# Altium PCB Octo-Electrode.PcbDoc (part 5 of 6)
Units mm, origin at the board's own origin, x right, y up, seen from the top; angles counter-clockwise.
Board outline 202.91 x 135.89 mm, 2 copper layers (Top Layer, Bottom Layer); 289 components, 165 nets, 790 pads, 510 vias.
Unrouted connection lines stored in the file: 83.
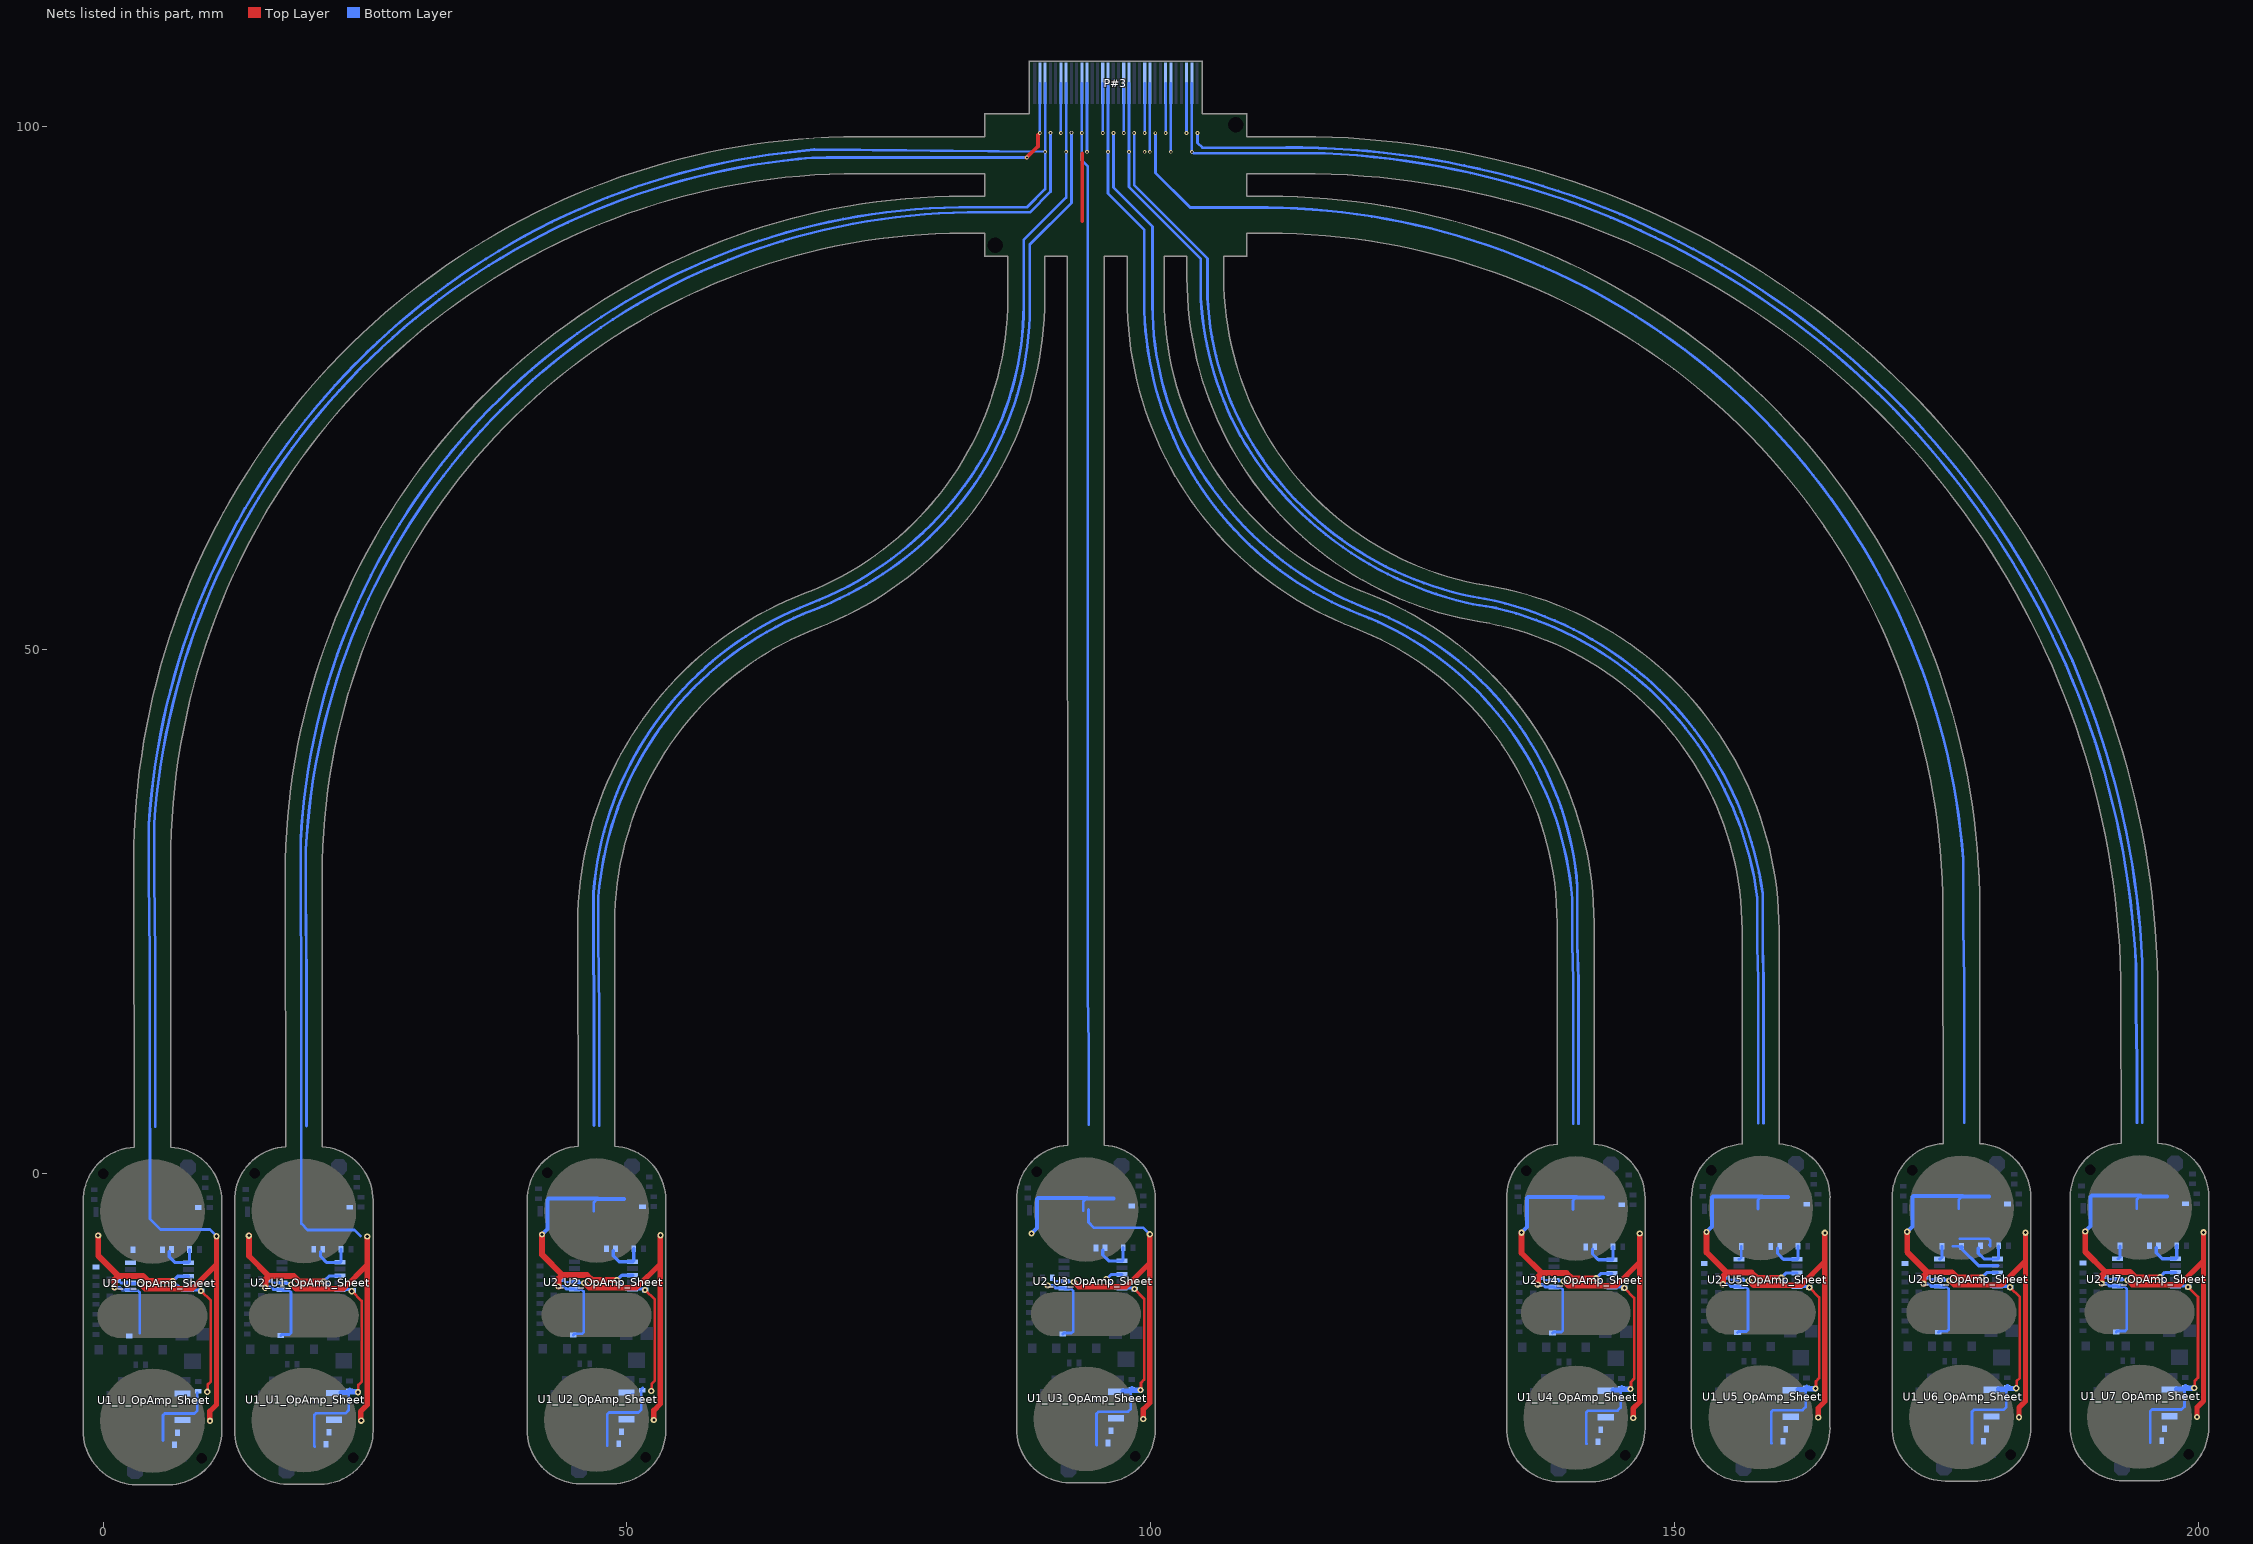
[diagram p4: the nets of this part, all layers, seen from the top]

## Via types
v1: diameter 0.6, hole 0.3, Top Layer to Bottom Layer, tented both sides, 464 vias
v2: diameter 0.35, hole 0.2, Top Layer to Bottom Layer, 46 vias

## Nets (pads, with @x,y where several pads share a name; then routed paths per layer and width w, separated by ;. In a path a pad name is that pad's centre, name@x,y a point inside that pad or via, vN(x,y) a via of type N, cw(c..) or ccw(c..) an arc to the next point about the centre after c; other vN are vias at no path point) (continued)
RECT_U5_OpAmp_Sheet: R7_U5_OpAmp_Sheet.2 R9_U5_OpAmp_Sheet.2 U2_U5_OpAmp_Sheet.7 | length 1.4
  Bottom Layer w0.254: U2_U5_OpAmp_Sheet.7@156.136,-8.171 156.213,-8.172 156.371,-8.013 R9_U5_OpAmp_Sheet.2@156.371,-6.947
RECT_U6_OpAmp_Sheet: R7_U6_OpAmp_Sheet.2 R9_U6_OpAmp_Sheet.2 U2_U6_OpAmp_Sheet.7 | length 1.4
  Bottom Layer w0.254: U2_U6_OpAmp_Sheet.7@175.295,-8.146 175.372,-8.146 175.53,-7.988 R9_U6_OpAmp_Sheet.2@175.53,-6.921
RECT_U7_OpAmp_Sheet: R7_U7_OpAmp_Sheet.2 R7_U7_OpAmp_Sheet_1.2 R9_U7_OpAmp_Sheet.2 R9_U7_OpAmp_Sheet_1.2 U2_U7_OpAmp_Sheet.7 | length 1.4
  Bottom Layer w0.254: U2_U7_OpAmp_Sheet.7@192.294,-8.121 192.371,-8.121 192.529,-7.963 R9_U7_OpAmp_Sheet_1.2@192.529,-6.896
RECT_U_OpAmp_Sheet: R7_U_OpAmp_Sheet.2 R9_U_OpAmp_Sheet.2 U2_U_OpAmp_Sheet.7
SMOOTH_U1_OpAmp_Sheet: C6_U1_OpAmp_Sheet.1 R8_U1_OpAmp_Sheet.2 R11_U1_OpAmp_Sheet.2 U2_U1_OpAmp_Sheet.8 | length 3.9
  Bottom Layer w0.254: U2_U1_OpAmp_Sheet.8@22.631,-8.465 U2_U1_OpAmp_Sheet.8@22.634,-8.462
  Bottom Layer w0.305: C6_U1_OpAmp_Sheet.1@20.752,-7.418 20.752,-7.906 21.311,-8.465 22.606,-8.465 U2_U1_OpAmp_Sheet.8@22.631,-8.465 ; U2_U1_OpAmp_Sheet.8@22.634,-8.462 22.702,-8.394 R11_U1_OpAmp_Sheet.2@22.702,-7.215
SMOOTH_U2_OpAmp_Sheet: C6_U2_OpAmp_Sheet.1 R8_U2_OpAmp_Sheet.2 R11_U2_OpAmp_Sheet.2 U2_U2_OpAmp_Sheet.8 | length 3.9
  Bottom Layer w0.254: U2_U2_OpAmp_Sheet.8@50.574,-8.4 U2_U2_OpAmp_Sheet.8@50.577,-8.397
  Bottom Layer w0.305: C6_U2_OpAmp_Sheet.1@48.694,-7.353 48.694,-7.841 49.253,-8.4 U2_U2_OpAmp_Sheet.8@50.548,-8.4 U2_U2_OpAmp_Sheet.8@50.574,-8.4 ; U2_U2_OpAmp_Sheet.8@50.577,-8.397 50.645,-8.33 R11_U2_OpAmp_Sheet.2@50.645,-7.15
SMOOTH_U3_OpAmp_Sheet: C6_U3_OpAmp_Sheet.1 R8_U3_OpAmp_Sheet.2 R11_U3_OpAmp_Sheet.2 U2_U3_OpAmp_Sheet.8 | length 3.9
  Bottom Layer w0.254: U2_U3_OpAmp_Sheet.8@97.295,-8.324 U2_U3_OpAmp_Sheet.8@97.298,-8.321
  Bottom Layer w0.305: C6_U3_OpAmp_Sheet.1@95.415,-7.277 95.415,-7.765 95.975,-8.324 U2_U3_OpAmp_Sheet.8@97.27,-8.324 U2_U3_OpAmp_Sheet.8@97.295,-8.324 ; U2_U3_OpAmp_Sheet.8@97.298,-8.321 97.366,-8.253 R11_U3_OpAmp_Sheet.2@97.366,-7.074
SMOOTH_U4_OpAmp_Sheet: C6_U4_OpAmp_Sheet.1 R8_U4_OpAmp_Sheet.2 R11_U4_OpAmp_Sheet.2 U2_U4_OpAmp_Sheet.8 | length 3.9
  Bottom Layer w0.254: U2_U4_OpAmp_Sheet.8@144.05,-8.222 U2_U4_OpAmp_Sheet.8@144.053,-8.22
  Bottom Layer w0.305: C6_U4_OpAmp_Sheet.1@142.17,-7.175 142.17,-7.663 142.73,-8.222 U2_U4_OpAmp_Sheet.8@144.025,-8.222 U2_U4_OpAmp_Sheet.8@144.05,-8.222 ; U2_U4_OpAmp_Sheet.8@144.053,-8.22 144.121,-8.152 R11_U4_OpAmp_Sheet.2@144.121,-6.972
SMOOTH_U5_OpAmp_Sheet: C6_U5_OpAmp_Sheet.1 R8_U5_OpAmp_Sheet.2 R11_U5_OpAmp_Sheet.2 U2_U5_OpAmp_Sheet.8 | length 3.9
  Bottom Layer w0.254: U2_U5_OpAmp_Sheet.8@161.711,-8.172 U2_U5_OpAmp_Sheet.8@161.714,-8.169
  Bottom Layer w0.305: C6_U5_OpAmp_Sheet.1@159.832,-7.124 159.832,-7.612 160.391,-8.172 U2_U5_OpAmp_Sheet.8@161.686,-8.171 U2_U5_OpAmp_Sheet.8@161.711,-8.172 ; U2_U5_OpAmp_Sheet.8@161.714,-8.169 161.782,-8.101 R11_U5_OpAmp_Sheet.2@161.782,-6.921
SMOOTH_U6_OpAmp_Sheet: C6_U6_OpAmp_Sheet.1 R8_U6_OpAmp_Sheet.2 R11_U6_OpAmp_Sheet.2 U2_U6_OpAmp_Sheet.8 | length 12.9
  Bottom Layer w0.254: 176.572,-6.921 177.13,-6.921 R8_U6_OpAmp_Sheet.2@177.308,-7.099 ; 177.232,-6.21 179.992,-6.21 180.14,-6.359 180.14,-6.896 180.039,-6.794 ; R8_U6_OpAmp_Sheet.2@177.397,-7.162 177.397,-6.921 R8_U6_OpAmp_Sheet.2@177.486,-7.01 ; U2_U6_OpAmp_Sheet.8@180.87,-8.146 U2_U6_OpAmp_Sheet.8@180.873,-8.143
  Bottom Layer w0.305: R8_U6_OpAmp_Sheet.2@177.397,-7.162 179.031,-8.796 180.87,-8.796 ; C6_U6_OpAmp_Sheet.1@178.99,-7.099 178.99,-7.587 179.55,-8.146 U2_U6_OpAmp_Sheet.8@180.845,-8.146 U2_U6_OpAmp_Sheet.8@180.87,-8.146 ; U2_U6_OpAmp_Sheet.8@180.873,-8.143 180.941,-8.076 R11_U6_OpAmp_Sheet.2@180.941,-6.896
SMOOTH_U7_OpAmp_Sheet: C6_U7_OpAmp_Sheet.1 C6_U7_OpAmp_Sheet_1.1 R8_U7_OpAmp_Sheet.2 R8_U7_OpAmp_Sheet_1.2 R11_U7_OpAmp_Sheet.2 R11_U7_OpAmp_Sheet_1.2 U2_U7_OpAmp_Sheet.8 | length 3.9
  Bottom Layer w0.254: U2_U7_OpAmp_Sheet.8@197.869,-8.121 U2_U7_OpAmp_Sheet.8@197.872,-8.118
  Bottom Layer w0.305: C6_U7_OpAmp_Sheet_1.1@195.989,-7.074 195.989,-7.562 196.549,-8.121 197.844,-8.121 U2_U7_OpAmp_Sheet.8@197.869,-8.121 ; U2_U7_OpAmp_Sheet.8@197.872,-8.118 197.94,-8.05 R11_U7_OpAmp_Sheet_1.2@197.94,-6.87
SMOOTH_U_OpAmp_Sheet: C6_U_OpAmp_Sheet.1 R8_U_OpAmp_Sheet.2 R11_U_OpAmp_Sheet.2 U2_U_OpAmp_Sheet.8 | length 3.8
  Bottom Layer w0.305: C6_U_OpAmp_Sheet.1@6.304,-7.442 6.304,-7.93 6.864,-8.489 U2_U_OpAmp_Sheet.8@8.159,-8.489 ; U2_U_OpAmp_Sheet.8@8.255,-8.419 R11_U_OpAmp_Sheet.2@8.255,-7.239
VCC_3V3: C1_U1_OpAmp_Sheet.1 C1_U2_OpAmp_Sheet.1 C1_U3_OpAmp_Sheet.1 C1_U4_OpAmp_Sheet.1 C1_U5_OpAmp_Sheet.1 C1_U6_OpAmp_Sheet.1 C1_U7_OpAmp_Sheet.1 C1_U7_OpAmp_Sheet_1.1 C1_U_OpAmp_Sheet.1 C2_U1_OpAmp_Sheet.1 C2_U2_OpAmp_Sheet.1 C2_U3_OpAmp_Sheet.1 C2_U4_OpAmp_Sheet.1 C2_U5_OpAmp_Sheet.1 C2_U6_OpAmp_Sheet.1 C2_U7_OpAmp_Sheet.1 C2_U7_OpAmp_Sheet_1.1 C2_U_OpAmp_Sheet.1 P#3.3 P#3.7 P#3.11 P#3.15 P#3.19 P#3.23 P#3.27 P#3.31 U1_U1_OpAmp_Sheet.8 U1_U2_OpAmp_Sheet.8 U1_U3_OpAmp_Sheet.8 U1_U4_OpAmp_Sheet.8 U1_U5_OpAmp_Sheet.8 U1_U6_OpAmp_Sheet.8 U1_U7_OpAmp_Sheet.8 U1_U_OpAmp_Sheet.8 U2_U1_OpAmp_Sheet.4 U2_U2_OpAmp_Sheet.4 U2_U3_OpAmp_Sheet.4 U2_U4_OpAmp_Sheet.4 U2_U5_OpAmp_Sheet.4 U2_U6_OpAmp_Sheet.4 U2_U7_OpAmp_Sheet.4 U2_U_OpAmp_Sheet.4 | length 1103.9
  Top Layer w0.381: 93.462,90.959 93.462,97.393
  Top Layer w0.508: v1@3.571,-10.531 4.013,-10.973 8.528,-10.973 10.812,-8.689 ; v1(10.189,-23.597) 10.189,-22.679 10.812,-22.055 10.812,-8.689 ; v1@10.812,-5.977 10.812,-8.689 ; v1@17.936,-10.556 17.961,-10.556 18.402,-10.998 22.918,-10.998 25.202,-8.713 ; v1@24.579,-23.622 24.579,-22.703 25.202,-22.08 25.202,-8.713 ; v1(25.21,-5.994) 25.202,-6.002 25.202,-8.713 ; v1(45.928,-10.44) 45.953,-10.44 46.394,-10.881 50.91,-10.881 53.194,-8.597 ; v1(52.57,-23.506) 52.57,-22.587 53.194,-21.964 53.194,-8.597 ; v1(53.202,-5.877) 53.194,-5.885 53.194,-8.597 ; v1@92.668,-10.35 93.109,-10.791 97.625,-10.791 99.909,-8.507 ; v1(99.286,-23.416) 99.286,-22.497 99.909,-21.874 99.909,-8.507 ; v1@99.909,-5.796 99.909,-8.507 ; v1(139.412,-10.264) 139.437,-10.264 139.879,-10.706 144.394,-10.706 146.678,-8.422 ; v1(146.055,-23.33) 146.055,-22.412 146.678,-21.788 146.678,-8.422 ; v1(146.686,-5.702) 146.678,-5.71 146.678,-8.422 ; v1(157.074,-10.214) 157.098,-10.214 157.54,-10.655 162.055,-10.655 164.339,-8.371 ; v1(163.716,-23.28) 163.716,-22.361 164.339,-21.738 164.339,-8.371 ; v1(164.348,-5.651) 164.339,-5.659 164.339,-8.371 ; v1(176.232,-10.188) 176.257,-10.188 176.699,-10.63 181.214,-10.63 183.498,-8.346 ; v1(182.875,-23.254) 182.875,-22.335 183.498,-21.712 183.498,-8.346 ; v1(183.506,-5.626) 183.498,-5.634 183.498,-8.346 ; v1(193.231,-10.163) 193.256,-10.163 193.698,-10.604 198.213,-10.604 200.497,-8.32 ; v1(199.874,-23.229) 199.874,-22.31 200.497,-21.687 200.497,-8.32 ; v1(200.505,-5.6) 200.497,-5.609 200.497,-8.32
  Bottom Layer w0.254: C2_U_OpAmp_Sheet.1@1.575,-10.287 1.727,-10.439 U2_U_OpAmp_Sheet.4@2.609,-10.439 ; U2_U_OpAmp_Sheet.4@2.655,-10.485 v1@3.5,-10.485 ; v1@10.812,-5.969 10.177,-5.334 5.478,-5.334 4.471,-4.327 4.471,2.539 4.471,4.283 4.463,4.291 4.463,20.853 4.463,20.856 4.361,28.195 4.361,33.311 cw(c73.382,28.792) 63.526,97.255 cw(c73.382,28.792) 63.53,97.255 63.532,97.256 cw(c63.563,97.004) 63.534,97.256 67.876,97.764 cw(c67.906,97.512) 67.91,97.766 v2(89.921,97.537) ; C2_U1_OpAmp_Sheet.1@15.984,-10.263 16.022,-10.263 16.174,-10.415 17.056,-10.415 17.102,-10.461 17.948,-10.461 v1@17.994,-10.507 ; 24.56,-5.944 23.984,-5.368 19.519,-5.368 18.915,-4.764 18.915,2.564 18.915,4.329 18.915,18.366 18.847,26.977 18.847,31.716 cw(c19.101,31.715) 18.847,31.726 cw(c82.578,28.437) 83.098,92.25 ; v1@24.582,-23.572 v1(24.636,-23.573) ; C2_U2_OpAmp_Sheet.1@43.926,-10.198 43.964,-10.198 44.117,-10.35 44.999,-10.35 45.045,-10.396 45.89,-10.396 v1@45.936,-10.442 ; 46.803,26.812 cw(c78.983,24.253) 67.438,54.399 ccw(c55.626,85.202) 82.807,66.507 ccw(c59.133,82.791) 87.867,82.793 87.867,89.125 91.921,93.179 v2(91.921,97.537) P#3.7@91.921,104.09 ; 46.804,26.798 46.804,22.353 46.852,15.597 46.852,4.599 ; v1@52.524,-23.507 v1@52.578,-23.507 ; 83.1,92.25 88.165,92.25 89.917,94.002 89.917,97.499 v2@89.929,97.512 ; P#3.3@89.921,104.09 89.921,97.551 v2@89.934,97.537 ; C2_U3_OpAmp_Sheet.1@90.648,-10.122 90.686,-10.122 90.838,-10.274 91.72,-10.274 91.766,-10.32 92.611,-10.32 v1@92.657,-10.366 ; v2@93.919,97.539 P#3.11@93.919,104.089 ; 94.058,-3.418 94.058,-4.637 94.589,-5.169 99.288,-5.169 v1@99.923,-5.804 ; P#3.15@95.921,104.09 v2(95.921,97.537) 95.921,93.565 99.373,90.113 99.373,83.357 ccw(c131.465,83.356) 119.923,53.411 cw(c108.573,23.755) 140.229,26.241 cw(c139.976,26.222) 140.23,26.222 140.23,21.972 140.329,18.406 140.329,4.776 ; P#3.19@97.921,104.09 v2(97.921,97.537) 97.921,94.186 104.783,87.324 104.783,83.578 ccw(c134.805,85.151) 112.359,65.152 ccw(c138.015,87.846) 130.141,54.51 ccw(c135.305,76.367) 132.627,54.069 ; v1@99.246,-23.431 v1@99.299,-23.431 ; v2(99.921,97.537) P#3.23@99.921,104.09 ; v2(101.921,97.537) P#3.27@101.921,104.09 ; v2(103.921,97.537) ccw(c104.212,97.828) 104.212,97.417 116.61,97.417 cw(c112.662,16.034) 194.053,19.785 ; v2@103.921,97.562 P#3.31@103.921,104.09 ; 132.627,54.069 cw(c132.599,53.816) 132.642,54.067 cw(c131.583,48.045) 132.994,53.994 cw(c125.445,22.15) 157.906,26.305 cw(c157.654,26.273) 157.908,26.273 157.908,21.718 157.99,18.457 157.99,4.827 ; C2_U4_OpAmp_Sheet.1@137.403,-10.02 137.441,-10.02 137.593,-10.172 138.475,-10.172 138.521,-10.218 139.366,-10.218 v1(139.412,-10.264) ; v1@146.001,-23.33 v1(146.055,-23.33) ; C2_U5_OpAmp_Sheet.1@155.064,-9.969 155.102,-9.969 155.254,-10.122 156.136,-10.122 156.182,-10.168 157.028,-10.168 v1(157.074,-10.214) ; v1@163.662,-23.279 v1(163.716,-23.28) ; C2_U6_OpAmp_Sheet.1@174.223,-9.944 174.261,-9.944 174.413,-10.096 175.295,-10.096 175.341,-10.142 176.186,-10.142 v1(176.232,-10.188) ; v1@182.821,-23.253 v1(182.875,-23.254) ; C2_U7_OpAmp_Sheet_1.1@191.222,-9.918 191.26,-9.918 191.412,-10.071 192.294,-10.071 192.34,-10.117 193.185,-10.117 v1(193.231,-10.163) ; 194.053,19.779 194.053,15.471 194.148,10.712 194.148,4.878 ; v1@199.82,-23.228 v1@199.873,-23.228
  other v1: 17.931,-10.57 3.546,-10.531 92.643,-10.35 10.82,-5.969 99.917,-5.788
  other v2: 93.917,97.537 99.424,97.537
VREF: P#3.2 P#3.6 P#3.10 P#3.14 P#3.18 P#3.22 P#3.26 P#3.30 | length 1061.3
  Top Layer w0.381: v2@88.149,97.004 89.215,98.07 89.215,99.137
  Bottom Layer w0.254: 4.862,33.385 4.862,28.195 4.963,20.855 4.963,4.51 ; 4.862,33.394 cw(c73.329,28.584) 66.36,96.866 cw(c69.07,70.343) 69.072,97.004 v2(88.174,97.004) ; 19.348,30.89 19.348,26.976 19.415,18.365 19.415,4.548 ; 19.348,30.9 cw(c83.407,27.631) 83.932,91.771 ; 47.352,4.599 47.352,15.597 47.272,22.353 47.272,26.432 cw(c79.176,23.904) 67.729,53.791 ccw(c55.393,85.964) 76.723,58.903 ccw(c57.21,83.659) 83.182,65.796 ccw(c58.525,82.755) 88.451,82.755 88.451,88.678 92.436,92.663 v2@92.436,99.391 ; 83.934,91.771 88.456,91.771 90.43,93.745 v2@90.43,99.394 ; v2(89.421,99.343) P#3.2@89.421,104.09 ; v2(91.421,99.343) P#3.6@91.421,104.09 ; v2@93.404,99.376 93.404,96.75 93.974,96.18 93.974,87.758 93.974,17.048 94.074,12.31 94.074,4.675 ; v2(93.421,99.343) P#3.10@93.421,104.09 ; v2(95.421,99.343) P#3.14@95.421,104.09 ; v2(96.44,99.343) 96.44,94.15 100.17,90.42 100.17,82.865 ccw(c129.621,82.865) 105.354,66.178 ccw(c132.94,84.94) 120.989,53.793 ; v2(97.421,99.343) P#3.18@97.421,104.09 ; v2@98.41,99.357 98.41,94.37 105.418,87.362 105.418,83.578 ccw(c135.199,85.138) 112.472,65.83 ccw(c137.066,86.723) 130.782,55.071 ccw(c134.607,74.314) 131.844,54.89 ; v2(99.421,99.343) P#3.22@99.421,104.09 ; v2@100.447,99.315 100.447,95.543 103.688,92.303 ; v2(101.421,99.343) P#3.26@101.421,104.09 ; v2(103.421,99.343) P#3.30@103.421,104.09 ; 103.762,92.229 111.159,92.229 cw(c110.413,24.888) 177.564,29.988 ; v2(104.47,99.343) 104.47,98.41 104.939,97.94 111.35,97.94 cw(c113.22,16.445) 194.648,20.251 194.648,4.878 ; 120.99,53.792 cw(c109.954,24.961) 140.729,27.395 ; 131.857,54.887 cw(c125.361,22.161) 158.408,26.753 158.408,21.718 158.49,18.457 158.49,4.827 ; 140.73,27.376 140.73,21.972 140.829,18.406 140.829,4.776 ; 177.565,29.97 177.565,23.548 177.649,18.482 177.649,4.853
  other v2: 98.421,99.338 100.441,99.327 90.438,99.355 92.439,99.368
VREF_GND: C4_U1_OpAmp_Sheet.2 C4_U2_OpAmp_Sheet.2 C4_U3_OpAmp_Sheet.2 C4_U4_OpAmp_Sheet.2 C4_U5_OpAmp_Sheet.2 C4_U6_OpAmp_Sheet.2 C4_U7_OpAmp_Sheet.2 C4_U7_OpAmp_Sheet_1.2 C4_U_OpAmp_Sheet.2 C5_U1_OpAmp_Sheet.2 C5_U2_OpAmp_Sheet.2 C5_U3_OpAmp_Sheet.2 C5_U4_OpAmp_Sheet.2 C5_U5_OpAmp_Sheet.2 C5_U6_OpAmp_Sheet.2 C5_U7_OpAmp_Sheet.2 C5_U7_OpAmp_Sheet_1.2 C5_U_OpAmp_Sheet.2 SB2_U1_OpAmp_Sheet.2 SB2_U2_OpAmp_Sheet.2 SB2_U3_OpAmp_Sheet.2 SB2_U4_OpAmp_Sheet.2 SB2_U5_OpAmp_Sheet.2 SB2_U6_OpAmp_Sheet.2 SB2_U7_OpAmp_Sheet.2 SB2_U7_OpAmp_Sheet_1.2 SB2_U_OpAmp_Sheet.2 SB3_U1_OpAmp_Sheet.1 SB3_U2_OpAmp_Sheet.1 SB3_U3_OpAmp_Sheet.1 SB3_U4_OpAmp_Sheet.1 SB3_U5_OpAmp_Sheet.1 SB3_U6_OpAmp_Sheet.1 SB3_U7_OpAmp_Sheet.1 SB3_U7_OpAmp_Sheet_1.1 SB3_U_OpAmp_Sheet.1 SB5_U1_OpAmp_Sheet.2 SB5_U2_OpAmp_Sheet.2 SB5_U3_OpAmp_Sheet.2 SB5_U4_OpAmp_Sheet.2 SB5_U5_OpAmp_Sheet.2 SB5_U6_OpAmp_Sheet.2 SB5_U7_OpAmp_Sheet.2 SB5_U7_OpAmp_Sheet_1.2 SB5_U_OpAmp_Sheet.2 U1_U1_OpAmp_Sheet.6 U1_U2_OpAmp_Sheet.6 U1_U3_OpAmp_Sheet.6 U1_U4_OpAmp_Sheet.6 U1_U5_OpAmp_Sheet.6 U1_U6_OpAmp_Sheet.6 U1_U7_OpAmp_Sheet.6 U1_U_OpAmp_Sheet.6 U2_U1_OpAmp_Sheet.3 U2_U1_OpAmp_Sheet.10 U2_U1_OpAmp_Sheet.12 U2_U2_OpAmp_Sheet.3 U2_U2_OpAmp_Sheet.10 U2_U2_OpAmp_Sheet.12 U2_U3_OpAmp_Sheet.3 U2_U3_OpAmp_Sheet.10 U2_U3_OpAmp_Sheet.12 U2_U4_OpAmp_Sheet.3 U2_U4_OpAmp_Sheet.10 U2_U4_OpAmp_Sheet.12 U2_U5_OpAmp_Sheet.3 U2_U5_OpAmp_Sheet.10 U2_U5_OpAmp_Sheet.12 U2_U6_OpAmp_Sheet.3 U2_U6_OpAmp_Sheet.10 U2_U6_OpAmp_Sheet.12 U2_U7_OpAmp_Sheet.3 U2_U7_OpAmp_Sheet.10 U2_U7_OpAmp_Sheet.12 U2_U_OpAmp_Sheet.3 U2_U_OpAmp_Sheet.10 U2_U_OpAmp_Sheet.12 | length 409.3
  Top Layer w0.254: v1(9.347,-11.189) 10.279,-12.12 10.279,-19.842 9.974,-20.147 v1@9.974,-20.785 ; v1@23.737,-11.213 24.669,-12.145 24.669,-19.867 24.364,-20.172 24.364,-20.81 v1@24.321,-20.853 ; v1(51.729,-11.097) 52.66,-12.029 52.66,-19.75 52.355,-20.055 52.355,-20.694 v1(52.313,-20.736) ; v1(98.444,-11.007) 99.375,-11.939 99.375,-19.661 99.071,-19.966 99.071,-20.604 v1(99.028,-20.647) ; v1(145.213,-10.922) 146.145,-11.853 146.145,-19.575 145.84,-19.88 145.84,-20.518 v1(145.797,-20.561) ; v1(162.874,-10.871) 163.806,-11.803 163.806,-19.524 163.501,-19.829 163.501,-20.468 v1(163.459,-20.51) ; v1(182.033,-10.846) 182.965,-11.777 182.965,-19.499 182.66,-19.804 182.66,-20.442 v1(182.617,-20.485) ; v1(199.032,-10.82) 199.964,-11.752 199.964,-19.474 199.659,-19.778 199.659,-20.417 v1(199.616,-20.459)
  Top Layer w0.559: v1@-0.475,-5.901 -0.475,-7.831 1.448,-9.754 ; v1@1.092,-10.853 1.092,-10.11 1.448,-9.754 ; v1@6.65,-10.257 4.313,-10.257 3.81,-9.754 1.448,-9.754 ; v1(13.907,-5.918) 13.915,-5.925 13.915,-7.856 15.837,-9.778 ; v1@15.474,-10.885 15.481,-10.878 15.481,-10.134 15.837,-9.778 ; v1@21.044,-10.286 21.04,-10.282 18.703,-10.282 18.2,-9.778 15.837,-9.778 ; v1(41.899,-5.801) 41.907,-5.809 41.907,-7.739 43.829,-9.662 ; v1(43.465,-10.769) 43.473,-10.761 43.473,-10.018 43.829,-9.662 ; v1(49.036,-10.17) 49.031,-10.165 46.695,-10.165 46.191,-9.662 43.829,-9.662 ; v1(135.383,-5.626) 135.391,-5.634 135.391,-7.564 137.314,-9.487 ; v1(136.95,-10.594) 136.958,-10.586 136.958,-9.843 137.314,-9.487 ; v1(142.521,-9.995) 142.516,-9.99 140.179,-9.99 139.676,-9.487 137.314,-9.487 ; v1(153.045,-5.575) 153.052,-5.583 153.052,-7.513 154.975,-9.436 ; v1(154.611,-10.543) 154.619,-10.535 154.619,-9.792 154.975,-9.436 ; v1(160.182,-9.944) 160.177,-9.939 157.84,-9.939 157.337,-9.436 154.975,-9.436 ; v1(172.203,-5.55) 172.211,-5.558 172.211,-7.488 174.134,-9.41 ; v1(173.77,-10.518) 173.778,-10.51 173.778,-9.766 174.134,-9.41 ; v1(179.341,-9.918) 179.336,-9.914 176.999,-9.914 176.496,-9.41 174.134,-9.41 ; v1(189.202,-5.524) 189.21,-5.532 189.21,-7.463 191.133,-9.385 ; v1(190.769,-10.492) 190.777,-10.484 190.777,-9.741 191.133,-9.385 ; v1(196.34,-9.893) 196.335,-9.888 193.998,-9.888 193.495,-9.385 191.133,-9.385
  Bottom Layer w0.254: U2_U_OpAmp_Sheet.3@2.584,-11.089 2.666,-11.171 3.308,-11.171 3.48,-11.343 3.48,-15.231 ; 5.715,-25.475 5.715,-23.064 ; 5.74,-23.038 5.893,-22.885 8.712,-22.885 8.991,-22.606 C4_U_OpAmp_Sheet.2@8.991,-20.917 ; SB5_U1_OpAmp_Sheet.2@16.936,-15.457 17.038,-15.355 17.778,-15.355 17.927,-15.206 17.927,-11.318 17.755,-11.147 17.113,-11.147 U2_U1_OpAmp_Sheet.3@17.031,-11.065 ; 20.188,-26.036 20.162,-26.011 20.162,-25.451 20.162,-23.04 20.188,-23.014 ; 20.188,-23.013 20.34,-22.861 23.159,-22.861 23.438,-22.582 23.438,-20.892 C4_U1_OpAmp_Sheet.2@23.438,-20.849 ; C4_U1_OpAmp_Sheet.2@23.438,-20.74 23.438,-20.638 C4_U1_OpAmp_Sheet.2@23.553,-20.524 ; C4_U1_OpAmp_Sheet.2@23.515,-20.849 23.515,-20.818 C4_U1_OpAmp_Sheet.2@23.515,-20.74 ; SB5_U2_OpAmp_Sheet.2@44.879,-15.392 44.98,-15.291 45.721,-15.291 45.869,-15.142 45.869,-11.254 45.698,-11.082 45.056,-11.082 U2_U2_OpAmp_Sheet.3@44.974,-11 ; 46.838,-3.596 46.838,-2.736 47.19,-2.384 ; 48.13,-25.971 48.105,-25.946 48.105,-25.386 48.105,-22.975 48.13,-22.949 ; 48.13,-22.949 48.282,-22.796 51.101,-22.796 51.381,-22.517 C4_U2_OpAmp_Sheet.2@51.381,-20.828 ; C4_U2_OpAmp_Sheet.2@51.381,-20.574 C4_U2_OpAmp_Sheet.2@51.495,-20.459 ; SB5_U3_OpAmp_Sheet.2@91.6,-15.316 91.702,-15.214 92.442,-15.214 92.591,-15.066 92.591,-11.177 92.419,-11.006 91.777,-11.006 U2_U3_OpAmp_Sheet.3@91.695,-10.924 ; 93.559,-3.519 93.559,-2.66 93.911,-2.308 ; 94.851,-25.895 94.826,-25.87 94.826,-25.31 94.826,-22.899 94.851,-22.873 ; 94.851,-22.872 95.004,-22.72 97.823,-22.72 98.102,-22.441 98.102,-20.752 C4_U3_OpAmp_Sheet.2@98.102,-20.708 ; C4_U3_OpAmp_Sheet.2@98.102,-20.599 98.102,-20.498 C4_U3_OpAmp_Sheet.2@98.216,-20.383 ; C4_U3_OpAmp_Sheet.2@98.179,-20.708 98.179,-20.677 C4_U3_OpAmp_Sheet.2@98.179,-20.6 ; SB5_U4_OpAmp_Sheet.2@138.355,-15.214 138.457,-15.113 139.197,-15.113 139.346,-14.964 139.346,-11.076 139.174,-10.904 138.532,-10.904 U2_U4_OpAmp_Sheet.3@138.45,-10.822 ; 140.314,-3.418 140.314,-2.559 140.667,-2.207 ; 141.606,-25.793 141.581,-25.768 141.581,-25.209 141.581,-22.797 141.606,-22.772 ; 141.606,-22.771 141.759,-22.618 144.578,-22.618 144.857,-22.339 144.857,-20.65 C4_U4_OpAmp_Sheet.2@144.857,-20.606 ; C4_U4_OpAmp_Sheet.2@144.857,-20.498 144.857,-20.396 C4_U4_OpAmp_Sheet.2@144.971,-20.282 ; C4_U4_OpAmp_Sheet.2@144.934,-20.606 144.934,-20.575 C4_U4_OpAmp_Sheet.2@144.934,-20.498 ; SB5_U5_OpAmp_Sheet.2@156.016,-15.164 156.118,-15.062 156.858,-15.062 157.007,-14.913 157.007,-11.025 156.835,-10.853 156.193,-10.853 U2_U5_OpAmp_Sheet.3@156.111,-10.772 ; 157.976,-3.367 157.976,-2.508 158.328,-2.156 ; 159.268,-25.743 159.242,-25.717 159.242,-25.158 159.242,-22.746 159.268,-22.721 ; 159.268,-22.72 159.42,-22.568 162.239,-22.568 162.518,-22.288 162.518,-20.599 C4_U5_OpAmp_Sheet.2@162.518,-20.556 ; C4_U5_OpAmp_Sheet.2@162.518,-20.447 162.518,-20.345 C4_U5_OpAmp_Sheet.2@162.632,-20.231 ; C4_U5_OpAmp_Sheet.2@162.595,-20.556 162.595,-20.525 C4_U5_OpAmp_Sheet.2@162.595,-20.447 ; SB5_U6_OpAmp_Sheet.2@175.175,-15.138 175.277,-15.037 176.017,-15.037 176.166,-14.888 176.166,-11 175.994,-10.828 175.352,-10.828 U2_U6_OpAmp_Sheet.3@175.27,-10.746 ; 177.134,-3.342 177.134,-2.482 177.486,-2.13 ; 178.426,-25.717 178.401,-25.692 178.401,-25.132 178.401,-22.721 178.426,-22.695 ; 178.426,-22.695 178.579,-22.542 181.398,-22.542 181.677,-22.263 181.677,-20.574 C4_U6_OpAmp_Sheet.2@181.677,-20.53 ; C4_U6_OpAmp_Sheet.2@181.677,-20.421 181.677,-20.32 C4_U6_OpAmp_Sheet.2@181.791,-20.205 ; C4_U6_OpAmp_Sheet.2@181.754,-20.53 181.754,-20.499 C4_U6_OpAmp_Sheet.2@181.754,-20.422 ; SB5_U7_OpAmp_Sheet_1.2@192.174,-15.113 192.276,-15.011 193.016,-15.011 193.165,-14.862 193.165,-10.974 192.993,-10.803 192.351,-10.803 U2_U7_OpAmp_Sheet.3@192.269,-10.721 ; 194.133,-3.316 194.133,-2.457 194.486,-2.105 ; 195.425,-25.692 195.4,-25.666 195.4,-25.107 195.4,-22.695 195.425,-22.67 ; 195.425,-22.669 195.578,-22.517 198.397,-22.517 198.676,-22.237 198.676,-20.548 C4_U7_OpAmp_Sheet_1.2@198.676,-20.505 ; C4_U7_OpAmp_Sheet_1.2@198.676,-20.396 198.676,-20.294 C4_U7_OpAmp_Sheet_1.2@198.79,-20.18 ; C4_U7_OpAmp_Sheet_1.2@198.753,-20.505 198.753,-20.474 C4_U7_OpAmp_Sheet_1.2@198.753,-20.396
  Bottom Layer w0.305: v1(1.084,-10.861) 1.59,-10.861 1.818,-11.089 U2_U_OpAmp_Sheet.3@2.584,-11.089 ; U2_U_OpAmp_Sheet.10@8.159,-9.789 7.127,-9.789 v1(6.655,-10.262) 7.483,-11.089 8.159,-11.089 C5_U_OpAmp_Sheet.2@9.159,-11.089 ; v1@15.531,-10.836 16.037,-10.836 16.266,-11.065 17.031,-11.065 U2_U1_OpAmp_Sheet.3@17.056,-11.065 ; U2_U1_OpAmp_Sheet.10@22.606,-9.765 21.574,-9.765 21.102,-10.237 21.93,-11.065 22.606,-11.065 23.606,-11.065 23.705,-11.164 C5_U1_OpAmp_Sheet.2@23.794,-11.164 ; v1@43.473,-10.772 43.979,-10.772 44.208,-11 44.974,-11 U2_U2_OpAmp_Sheet.3@44.998,-11 ; U2_U2_OpAmp_Sheet.10@50.549,-9.7 49.516,-9.7 49.044,-10.172 49.872,-11 U2_U2_OpAmp_Sheet.12@50.548,-11 51.549,-11 51.648,-11.1 C5_U2_OpAmp_Sheet.2@51.737,-11.1 ; v1@90.195,-10.695 90.701,-10.695 90.929,-10.924 91.695,-10.924 U2_U3_OpAmp_Sheet.3@91.72,-10.924 ; U2_U3_OpAmp_Sheet.10@97.27,-9.624 96.238,-9.624 95.766,-10.096 96.594,-10.924 U2_U3_OpAmp_Sheet.12@97.27,-10.924 98.27,-10.924 98.369,-11.023 C5_U3_OpAmp_Sheet.2@98.458,-11.024 ; v1(136.95,-10.594) 137.456,-10.594 137.684,-10.822 138.45,-10.822 U2_U4_OpAmp_Sheet.3@138.475,-10.822 ; U2_U4_OpAmp_Sheet.10@144.025,-9.522 142.993,-9.522 v1(142.521,-9.995) 143.349,-10.822 U2_U4_OpAmp_Sheet.12@144.025,-10.822 145.025,-10.822 145.124,-10.922 v1(145.213,-10.922) ; v1(154.611,-10.543) 155.117,-10.543 155.346,-10.772 156.111,-10.772 U2_U5_OpAmp_Sheet.3@156.136,-10.771 ; U2_U5_OpAmp_Sheet.10@161.686,-9.472 160.654,-9.472 v1(160.182,-9.944) 161.01,-10.772 U2_U5_OpAmp_Sheet.12@161.686,-10.771 162.686,-10.772 162.785,-10.871 v1(162.874,-10.871) ; v1(173.77,-10.518) 174.276,-10.518 174.504,-10.746 175.27,-10.746 U2_U6_OpAmp_Sheet.3@175.295,-10.746 ; U2_U6_OpAmp_Sheet.10@180.845,-9.446 179.813,-9.446 v1(179.341,-9.918) 180.169,-10.746 U2_U6_OpAmp_Sheet.12@180.845,-10.746 181.845,-10.746 181.944,-10.846 v1(182.033,-10.846) ; v1(190.769,-10.492) 191.275,-10.492 191.503,-10.721 192.269,-10.721 U2_U7_OpAmp_Sheet.3@192.294,-10.721 ; U2_U7_OpAmp_Sheet.10@197.844,-9.421 196.812,-9.421 v1(196.34,-9.893) 197.168,-10.721 197.844,-10.721 198.844,-10.721 198.943,-10.82 v1(199.032,-10.82)
  Bottom Layer w0.381: v1@41.907,-5.804 42.428,-5.283 42.428,-2.489 42.532,-2.384 47.19,-2.384 47.242,-2.436 49.701,-2.436 ; v1@88.628,-5.727 89.149,-5.207 89.149,-2.413 89.254,-2.308 93.911,-2.308 93.963,-2.36 96.422,-2.36 ; v1(135.383,-5.626) 135.904,-5.105 135.904,-2.311 136.009,-2.207 140.667,-2.207 140.718,-2.258 143.177,-2.258 ; v1(153.045,-5.575) 153.565,-5.054 153.565,-2.26 153.67,-2.156 158.328,-2.156 158.379,-2.207 160.838,-2.207 ; v1(172.203,-5.55) 172.724,-5.029 172.724,-2.235 172.829,-2.13 177.486,-2.13 177.538,-2.182 179.997,-2.182 ; v1(189.202,-5.524) 189.723,-5.004 189.723,-2.21 189.828,-2.105 194.486,-2.105 194.537,-2.156 196.996,-2.156
  Bottom Layer w0.508: U1_U1_OpAmp_Sheet.6@22.702,-20.892 23.438,-20.892 23.513,-20.818 23.515,-20.818 24.364,-20.818 v1@24.379,-20.804 ; U1_U3_OpAmp_Sheet.6@97.366,-20.752 98.102,-20.752 98.177,-20.677 98.179,-20.677 99.028,-20.677 v1@99.042,-20.663 ; U1_U4_OpAmp_Sheet.6@144.121,-20.65 144.857,-20.65 144.932,-20.575 144.934,-20.575 145.783,-20.575 v1(145.797,-20.561) ; U1_U5_OpAmp_Sheet.6@161.782,-20.599 162.518,-20.599 162.593,-20.525 162.595,-20.525 163.444,-20.525 v1(163.459,-20.51) ; U1_U6_OpAmp_Sheet.6@180.941,-20.574 181.677,-20.574 181.752,-20.499 181.754,-20.499 182.603,-20.499 v1(182.617,-20.485) ; U1_U7_OpAmp_Sheet.6@197.94,-20.548 198.676,-20.548 198.751,-20.474 198.753,-20.474 199.602,-20.474 v1(199.616,-20.459)
  other v1: 24.316,-20.867 24.316,-20.867 9.931,-20.828 9.931,-20.828 52.313,-20.736 99.028,-20.647 145.797,-20.561 163.459,-20.51 182.617,-20.485 199.616,-20.459 23.732,-11.227 23.732,-11.227 9.347,-11.189 51.729,-11.097 98.444,-11.007 145.213,-10.922 15.469,-10.899 15.469,-10.899 162.874,-10.871 1.084,-10.861 182.033,-10.846 199.032,-10.82 43.465,-10.769 90.18,-10.679 90.18,-10.679 136.95,-10.594 154.611,-10.543 173.77,-10.518 190.769,-10.492 21.039,-10.3 21.039,-10.3 6.655,-10.262 49.036,-10.17 95.751,-10.08 95.751,-10.08 142.521,-9.995 160.182,-9.944 179.341,-9.918 196.34,-9.893 13.907,-5.918 -0.483,-5.893 -0.483,-5.893 41.899,-5.801 88.614,-5.711 88.614,-5.711 135.383,-5.626 153.045,-5.575 172.203,-5.55 189.202,-5.524
copper on no net: | length 468.9
  Top Layer w0.254: -1.295,-18.694 -1.295,-18.677 ; 3.141,-5.153 4.711,-3.583 ; 9.931,-20.828 9.974,-20.785 ; 89.779,-7.391 91.228,-8.84 92.907,-8.84
  Top Layer w0.305: 2.788,-16.561 2.794,-16.561 ; 10.742,-4.396 10.744,-4.394 ; v1(23.788,-6.476) 24.143,-6.121 24.143,-5.156 24.529,-4.77 24.529,-2.611 24.905,-2.235 v1(24.905,-1.477) ; 87.785,-4.515 87.785,-1.892 cw(c89.748,-1.892) v1(88.36,-0.504) ; 98.4,-8.945 99.307,-8.038 99.307,-5.203 99.839,-4.672 99.839,-4.215 99.841,-4.213 ; 98.495,-6.27 98.85,-5.915 98.85,-4.949 99.236,-4.564 99.236,-2.405 99.612,-2.028 99.612,-1.271 ; v1(145.264,-6.185) 145.62,-5.829 145.62,-4.864 146.005,-4.478 146.005,-2.319 146.382,-1.943 v1(146.382,-1.186) ; v1(162.925,-6.134) 163.281,-5.778 163.281,-4.813 163.667,-4.427 163.667,-2.268 164.043,-1.892 v1(164.043,-1.135)
  Top Layer w0.508: 1.321,1.143 1.339,1.161 ; 3.546,-10.531 3.571,-10.531 ; 10.812,-5.977 10.82,-5.969 ; v1(43.71,1.232) v1@43.728,1.25 ; v1(90.417,1.324) 90.435,1.343 cw(c92.231,-0.454) 92.231,2.086 95.526,2.086 cw(c95.526,1.289) 96.09,1.853 ; 92.643,-10.35 92.668,-10.35 ; 94.151,-9.344 94.549,-8.945 98.4,-8.945 ; 99.909,-5.796 99.917,-5.788 ; v1(137.187,1.41) 137.205,1.428 cw(c139.001,-0.368) 139.001,2.172 142.296,2.172 cw(c142.296,1.375) v1(142.859,1.939) ; v1(154.848,1.461) 154.866,1.479 cw(c156.662,-0.317) 156.662,2.223 159.957,2.223 cw(c159.957,1.426) v1(160.52,1.989)
  Top Layer w0.559: -0.483,-5.893 -0.475,-5.901 ; 1.084,-10.861 1.092,-10.853 ; 4.698,-21.311 4.705,-21.317 4.705,-23.567 ; 6.65,-10.257 6.655,-10.262 ; 88.614,-5.711 88.622,-5.719 88.622,-7.65 90.544,-9.572 ; 90.18,-10.679 90.188,-10.671 90.188,-9.928 90.544,-9.572 ; 95.751,-10.08 95.747,-10.075 93.41,-10.075 92.907,-9.572 90.544,-9.572
  Bottom Layer w0.254: -0.686,-9.842 -0.444,-9.842 ; -0.413,-16.815 -0.413,-16.865 -0.14,-17.138 -0.007,-17.138 0.051,-17.196 ; 0.965,-4.801 cw(c0.505,-5.261) 1.156,-5.261 cw(c1.346,-5.451) 1.346,-5.182 ; 1.537,-10.287 1.575,-10.287 ; 1.651,-16.579 1.887,-16.815 ; 2.489,-15.481 2.591,-15.38 3.331,-15.38 3.48,-15.231 ; 2.582,-11.737 2.584,-11.739 2.609,-11.739 ; 2.584,-9.789 2.609,-9.789 ; 2.609,-10.439 2.655,-10.485 ; 2.609,-8.489 2.686,-8.489 2.844,-8.331 2.844,-7.264 ; 3.5,-10.485 3.546,-10.531 ; 4.444,-7.264 4.622,-7.442 ; 4.711,-7.505 4.711,-7.264 4.8,-7.353 ; 4.862,33.385 4.862,33.394 ; 5.359,-16.762 5.359,-16.658 5.567,-16.866 ; 5.362,32.88 cw(c5.616,32.88) 5.362,32.896 ; 5.715,-25.475 5.715,-26.035 5.74,-26.06 ; 5.715,-23.064 5.74,-23.039 ; 7.353,-7.137 7.454,-7.239 ; 7.525,-15.342 7.95,-15.766 ; 7.525,-13.518 8.102,-12.941 ; 8.184,-8.489 8.187,-8.487 ; 8.534,-17.399 8.737,-17.399 9.153,-17.399 ; 8.991,-20.917 8.991,-20.873 ; 8.991,-20.764 8.991,-20.663 9.105,-20.549 ; 9.068,-20.873 9.068,-20.842 9.068,-20.764 ; 9.258,-10.249 9.347,-10.249 ; 10.135,-23.597 10.188,-23.597 ; 10.812,-5.969 10.82,-5.969 ; 18.354,32.189 cw(c18.608,32.188) 18.354,32.202 ; 19.348,30.89 cw(c19.602,30.889) 19.348,30.9 ; 19.899,-3.545 19.899,-4.545 20.193,-4.838 24.339,-4.838 24.882,-4.295 24.882,-4.064 ; 41.976,-16.726 41.976,-16.776 42.249,-17.049 42.382,-17.049 42.44,-17.107 ; 42.266,-0.851 42.338,-0.851 ; 47.337,-3.494 47.337,-4.714 47.868,-5.245 52.567,-5.245 53.202,-5.88 53.21,-5.88 ; 51.381,-20.828 51.381,-20.784 ; 51.381,-20.675 51.381,-20.574 ; 51.457,-20.784 51.457,-20.753 51.457,-20.675 ; 66.693,54.596 66.694,54.596 ; 66.915,96.266 cw(c66.939,96.013) 66.939,96.267 ; 85.012,98.351 85.013,98.351 ; 88.988,-0.774 89.059,-0.774 ; 92.972,89.663 93.033,89.663 ; v2@93.465,90.956 93.465,17.048 93.574,12.31 93.574,4.675 ; 99.424,97.537 99.424,95.797 103.477,91.744 103.551,91.67 111.184,91.67 cw(c109.82,24.246) 177.063,29.362 cw(c176.81,29.344) 177.064,29.344 177.064,23.547 177.149,18.482 177.149,4.853 ; 99.923,-5.804 99.931,-5.804 ; 103.688,92.303 103.762,92.229 ; 104.193,85.39 104.199,85.396 ; 110.929,65.96 110.93,65.959 cw(c110.734,65.797) 110.934,65.954 ; 131.249,53.595 ccw(c131.295,53.845) 131.265,53.593 ; 131.844,54.89 cw(c131.807,54.638) 131.857,54.887 ; 135.743,-0.673 135.814,-0.673 ; 139.729,24.916 cw(c139.476,24.897) 139.73,24.897 ; 140.73,27.376 ccw(c140.476,27.376) 140.729,27.395 ; 140.813,-3.316 140.813,-4.536 141.344,-5.067 146.043,-5.067 146.678,-5.702 146.686,-5.702 ; 153.404,-0.622 153.475,-0.622 ; 158.474,-3.265 158.474,-4.485 159.005,-5.016 163.704,-5.016 164.339,-5.651 164.348,-5.651 ; 172.563,-0.597 172.634,-0.597 ; 176.563,29.058 cw(c176.31,29.04) 176.564,29.04 ; 177.564,29.988 cw(c177.311,29.97) 177.565,29.97 ; 177.633,-3.24 177.633,-4.46 178.164,-4.991 182.863,-4.991 183.498,-5.626 183.506,-5.626 ; 189.562,-0.571 189.633,-0.571 ; 194.632,-3.215 194.632,-4.434 195.163,-4.965 199.862,-4.965 200.497,-5.6 200.505,-5.6 ; 195.148,11.702 cw(c195.402,11.702) 195.148,11.715
  Bottom Layer w0.305: 1.067,-6.604 ccw(c0.852,-6.389) 1.156,-6.389 1.156,-6.02 ; 2.584,-11.089 2.609,-11.089 ; 2.794,-16.307 2.794,-16.485 2.87,-16.485 ; v1(5.537,-14.376) 5.537,-13.703 ; 8.159,-10.439 8.191,-10.408 ; 8.159,-8.489 8.184,-8.489 ; 8.187,-8.487 8.255,-8.419 ; 9.159,-11.089 9.258,-11.189 9.347,-11.189 ; 9.176,-10.408 9.296,-10.287 ; 9.699,-18.895 9.725,-18.895 ; 15.519,-6.566 ccw(c15.304,-6.351) 15.608,-6.351 15.608,-5.981 ; 24.206,-1.296 ccw(c24.493,-1.008) 24.493,-1.414 v1@24.968,-1.414 ; v1(41.653,-0.597) ccw(c42.266,0.017) 42.266,-0.851 ; 42.338,-0.851 ccw(c42.338,0.624) 43.38,-0.419 ; v1(88.374,-0.52) ccw(c88.988,0.093) 88.988,-0.774 ; 89.059,-0.774 ccw(c89.059,0.7) 90.102,-0.343 ; 135.129,-0.419 ccw(c135.743,0.194) 135.743,-0.673 ; 135.814,-0.673 ccw(c135.814,0.801) 136.857,-0.241 ; 145.62,-1.067 ccw(c145.907,-0.779) 145.907,-1.186 v1(146.382,-1.186) ; 152.791,-0.368 ccw(c153.404,0.245) 153.404,-0.622 ; 153.475,-0.622 ccw(c153.475,0.852) 154.518,-0.19 ; 163.281,-1.016 ccw(c163.568,-0.728) 163.568,-1.135 v1(164.043,-1.135) ; 171.949,-0.343 ccw(c172.563,0.271) 172.563,-0.597 ; 172.634,-0.597 ccw(c172.634,0.878) 173.677,-0.165 ; 188.948,-0.317 ccw(c189.562,0.296) 189.562,-0.571 ; 189.633,-0.571 ccw(c189.633,0.903) 190.676,-0.139
  Bottom Layer w0.381: -0.483,-5.893 0.038,-5.372 0.038,-2.578 0.143,-2.473 ; 13.97,-5.854 14.49,-5.334 14.49,-2.54 14.595,-2.435 ; v1@23.845,-6.427 25.115,-7.697 25.115,-16.181 24.76,-16.536 24.125,-16.536 ; 43.38,-0.419 ccw(c42.583,0.378) 43.71,0.378 v1(43.71,1.232) ; 51.788,-6.362 53.058,-7.632 53.058,-16.116 52.702,-16.472 52.067,-16.472 ; 90.102,-0.343 ccw(c89.304,0.455) 90.432,0.455 v1@90.432,1.308 ; 136.857,-0.241 ccw(c136.059,0.556) 137.187,0.556 v1(137.187,1.41) ; v1(145.264,-6.185) 146.534,-7.455 146.534,-15.938 146.178,-16.294 145.543,-16.294 ; 154.518,-0.19 ccw(c153.721,0.607) 154.848,0.607 v1(154.848,1.461) ; v1(162.925,-6.134) 164.195,-7.404 164.195,-15.887 163.84,-16.243 163.205,-16.243 ; 173.677,-0.165 ccw(c172.879,0.632) 174.007,0.632 174.007,1.486 ; 182.084,-6.108 183.354,-7.378 183.354,-15.862 182.998,-16.218 182.363,-16.218 ; 190.676,-0.139 ccw(c189.878,0.658) 191.006,0.658 191.006,1.512 ; 199.083,-6.083 200.353,-7.353 200.353,-15.837 199.997,-16.192 199.362,-16.192
  Bottom Layer w0.508: 8.077,0.483 8.077,0.588 ; 8.255,-20.917 8.991,-20.917 9.066,-20.842 9.068,-20.842 9.917,-20.842 9.931,-20.828 ; 22.529,0.521 22.529,0.626 ; 24.618,-3.483 24.77,-3.635 ; 50.645,-20.828 51.381,-20.828 51.455,-20.753 51.457,-20.753 52.307,-20.753 52.321,-20.739 ; 141.911,-0.978 142.493,-0.978 ; 143.943,0.855 143.943,0.75 144.82,-0.127 145.62,-0.127 ; 159.572,-0.927 160.154,-0.927 ; 161.604,0.905 161.604,0.8 162.481,-0.076 163.281,-0.076
  Bottom Layer w0.559: 6.528,-28.981 6.536,-28.974
  Bottom Layer w0.635: v1(142.859,1.939) 143.943,0.855 ; v1(160.52,1.989) 161.604,0.905
  other v1: 5.537,-14.376 23.788,-6.476 145.264,-6.185 162.925,-6.134 24.905,-1.477 146.382,-1.186 164.043,-1.135 90.417,1.324 137.187,1.41 154.848,1.461 142.859,1.939 160.52,1.989
  other v2: 93.462,90.959

## Polygon pours and split planes (outlines as drawn)
no net on Bottom Layer "NONET_L02_P047" (hatched 45Degree grid 0.508 track 0.254, remove dead copper, shelved, pour order 47): 198.327,-24.082 198.327,-2.238 190.377,-2.238 190.377,-24.082
no net on Bottom Layer "NONET_L02_P045" (hatched 45Degree grid 0.508 track 0.254, remove dead copper, shelved, pour order 45): 181.328,-24.108 181.328,-2.264 173.378,-2.264 173.378,-24.108
no net on Bottom Layer "NONET_L02_P043" (hatched 45Degree grid 0.508 track 0.254, remove dead copper, shelved, pour order 43): 162.169,-24.133 162.169,-2.289 154.219,-2.289 154.219,-24.133
no net on Bottom Layer "NONET_L02_P041" (hatched 45Degree grid 0.508 track 0.254, remove dead copper, shelved, pour order 41): 144.508,-24.184 144.508,-2.34 136.558,-2.34 136.558,-24.184
no net on Bottom Layer "NONET_L02_P039" (hatched 45Degree grid 0.508 track 0.254, remove dead copper, shelved, pour order 39): 97.753,-24.286 97.753,-2.442 89.803,-2.442 89.803,-24.286
no net on Bottom Layer "NONET_L02_P037" (hatched 45Degree grid 0.508 track 0.254, remove dead copper, shelved, pour order 37): 51.032,-24.362 51.032,-2.518 43.082,-2.518 43.082,-24.362
no net on Bottom Layer "NONET_L02_P035" (hatched 45Degree grid 0.508 track 0.254, remove dead copper, shelved, pour order 35): 23.094,-24.413 23.094,-2.569 15.144,-2.569 15.144,-24.413
no net on Bottom Layer "NONET_L02_P033" (hatched 45Degree grid 0.508 track 0.254, remove dead copper, shelved, pour order 33): 8.642,-24.451 8.642,-2.607 0.692,-2.607 0.692,-24.451
no net on Bottom Layer "NONET_L02_P030" (hatched 45Degree grid 0.508 track 0.254, remove dead copper, shelved, pour order 30): 198.327,-24.072 198.327,-2.228 190.377,-2.228 190.377,-24.072
no net on Bottom Layer "NONET_L02_P028" (hatched 45Degree grid 0.508 track 0.254, remove dead copper, shelved, pour order 28): 181.328,-24.106 181.328,-2.262 173.378,-2.262 173.378,-24.106
no net on Bottom Layer "NONET_L02_P026" (hatched 45Degree grid 0.508 track 0.254, remove dead copper, shelved, pour order 26): 162.168,-24.144 162.168,-2.3 154.218,-2.3 154.218,-24.144
no net on Bottom Layer "NONET_L02_P024" (hatched 45Degree grid 0.508 track 0.254, remove dead copper, shelved, pour order 24): 144.508,-24.18 144.508,-2.336 136.558,-2.336 136.558,-24.18
no net on Bottom Layer "NONET_L02_P022" (hatched 45Degree grid 0.508 track 0.254, remove dead copper, shelved, pour order 22): 97.753,-24.273 97.753,-2.429 89.803,-2.429 89.803,-24.273
no net on Bottom Layer "NONET_L02_P020" (hatched 45Degree grid 0.508 track 0.254, remove dead copper, shelved, pour order 20): 51.029,-24.366 51.029,-2.522 43.078,-2.522 43.078,-24.366
no net on Bottom Layer "NONET_L02_P018" (hatched 45Degree grid 0.508 track 0.254, remove dead copper, shelved, pour order 18): 23.094,-24.422 23.094,-2.578 15.144,-2.578 15.144,-24.422
no net on Bottom Layer "NONET_L02_P016" (hatched 45Degree grid 0.508 track 0.254, remove dead copper, shelved, pour order 16): 8.642,-24.451 8.642,-2.607 0.692,-2.607 0.692,-24.451
no net on Top Layer "NONET_L01_P046" (hatched 45Degree grid 0.508 track 0.254, remove dead copper, shelved, pour order 46): 198.327,-24.082 198.327,-2.238 190.377,-2.238 190.377,-24.082
no net on Top Layer "NONET_L01_P044" (hatched 45Degree grid 0.508 track 0.254, remove dead copper, shelved, pour order 44): 181.328,-24.108 181.328,-2.264 173.378,-2.264 173.378,-24.108
no net on Top Layer "NONET_L01_P042" (hatched 45Degree grid 0.508 track 0.254, remove dead copper, shelved, pour order 42): 162.169,-24.133 162.169,-2.289 154.219,-2.289 154.219,-24.133
no net on Top Layer "NONET_L01_P040" (hatched 45Degree grid 0.508 track 0.254, remove dead copper, shelved, pour order 40): 144.508,-24.184 144.508,-2.34 136.558,-2.34 136.558,-24.184
no net on Top Layer "NONET_L01_P038" (hatched 45Degree grid 0.508 track 0.254, remove dead copper, shelved, pour order 38): 97.753,-24.286 97.753,-2.442 89.803,-2.442 89.803,-24.286
no net on Top Layer "NONET_L01_P036" (hatched 45Degree grid 0.508 track 0.254, remove dead copper, shelved, pour order 36): 51.032,-24.362 51.032,-2.518 43.082,-2.518 43.082,-24.362
no net on Top Layer "NONET_L01_P034" (hatched 45Degree grid 0.508 track 0.254, remove dead copper, shelved, pour order 34): 23.094,-24.413 23.094,-2.569 15.144,-2.569 15.144,-24.413
no net on Top Layer "NONET_L01_P032" (hatched 45Degree grid 0.508 track 0.254, remove dead copper, shelved, pour order 32): 8.642,-24.451 8.642,-2.607 0.692,-2.607 0.692,-24.451
no net on Top Layer "NONET_L01_P031" (hatched 45Degree grid 0.508 track 0.254, remove dead copper, shelved, pour order 31): 198.327,-24.072 198.327,-2.228 190.377,-2.228 190.377,-24.072
no net on Top Layer "NONET_L01_P029" (hatched 45Degree grid 0.508 track 0.254, remove dead copper, shelved, pour order 29): 181.328,-24.106 181.328,-2.262 173.378,-2.262 173.378,-24.106
no net on Top Layer "NONET_L01_P027" (hatched 45Degree grid 0.508 track 0.254, remove dead copper, shelved, pour order 27): 162.168,-24.144 162.168,-2.3 154.218,-2.3 154.218,-24.144
no net on Top Layer "NONET_L01_P025" (hatched 45Degree grid 0.508 track 0.254, remove dead copper, shelved, pour order 25): 144.508,-24.18 144.508,-2.336 136.558,-2.336 136.558,-24.18
no net on Top Layer "NONET_L01_P023" (hatched 45Degree grid 0.508 track 0.254, remove dead copper, shelved, pour order 23): 97.753,-24.273 97.753,-2.429 89.803,-2.429 89.803,-24.273
no net on Top Layer "NONET_L01_P021" (hatched 45Degree grid 0.508 track 0.254, remove dead copper, shelved, pour order 21): 51.029,-24.366 51.029,-2.522 43.078,-2.522 43.078,-24.366
no net on Top Layer "NONET_L01_P019" (hatched 45Degree grid 0.508 track 0.254, remove dead copper, shelved, pour order 19): 23.094,-24.422 23.094,-2.578 15.144,-2.578 15.144,-24.422
no net on Top Layer "NONET_L01_P017" (hatched 45Degree grid 0.508 track 0.254, remove dead copper, shelved, pour order 17): 8.642,-24.451 8.642,-2.607 0.692,-2.607 0.692,-24.451

## Other copper
Top Layer:
  rectangle net VCC_3V3: 89.588,96.902 104.219,97.891
  rectangle net GND: 88.161,100.331 104.702,101.22
  rectangle net VREF: 88.984,99.007 104.836,100.077